# Altium PCB ePBR25_ACU_Controller_rev0.PcbDoc (part 2 of 2)
Units mil, origin at the board's own origin, x right, y up, seen from the top; angles counter-clockwise.
Board outline 3048 x 1903 mil, 2 copper layers (Top Layer, Bottom Layer); 150 components, 106 nets, 515 pads, 139 vias.
Unrouted connection lines stored in the file: 127.
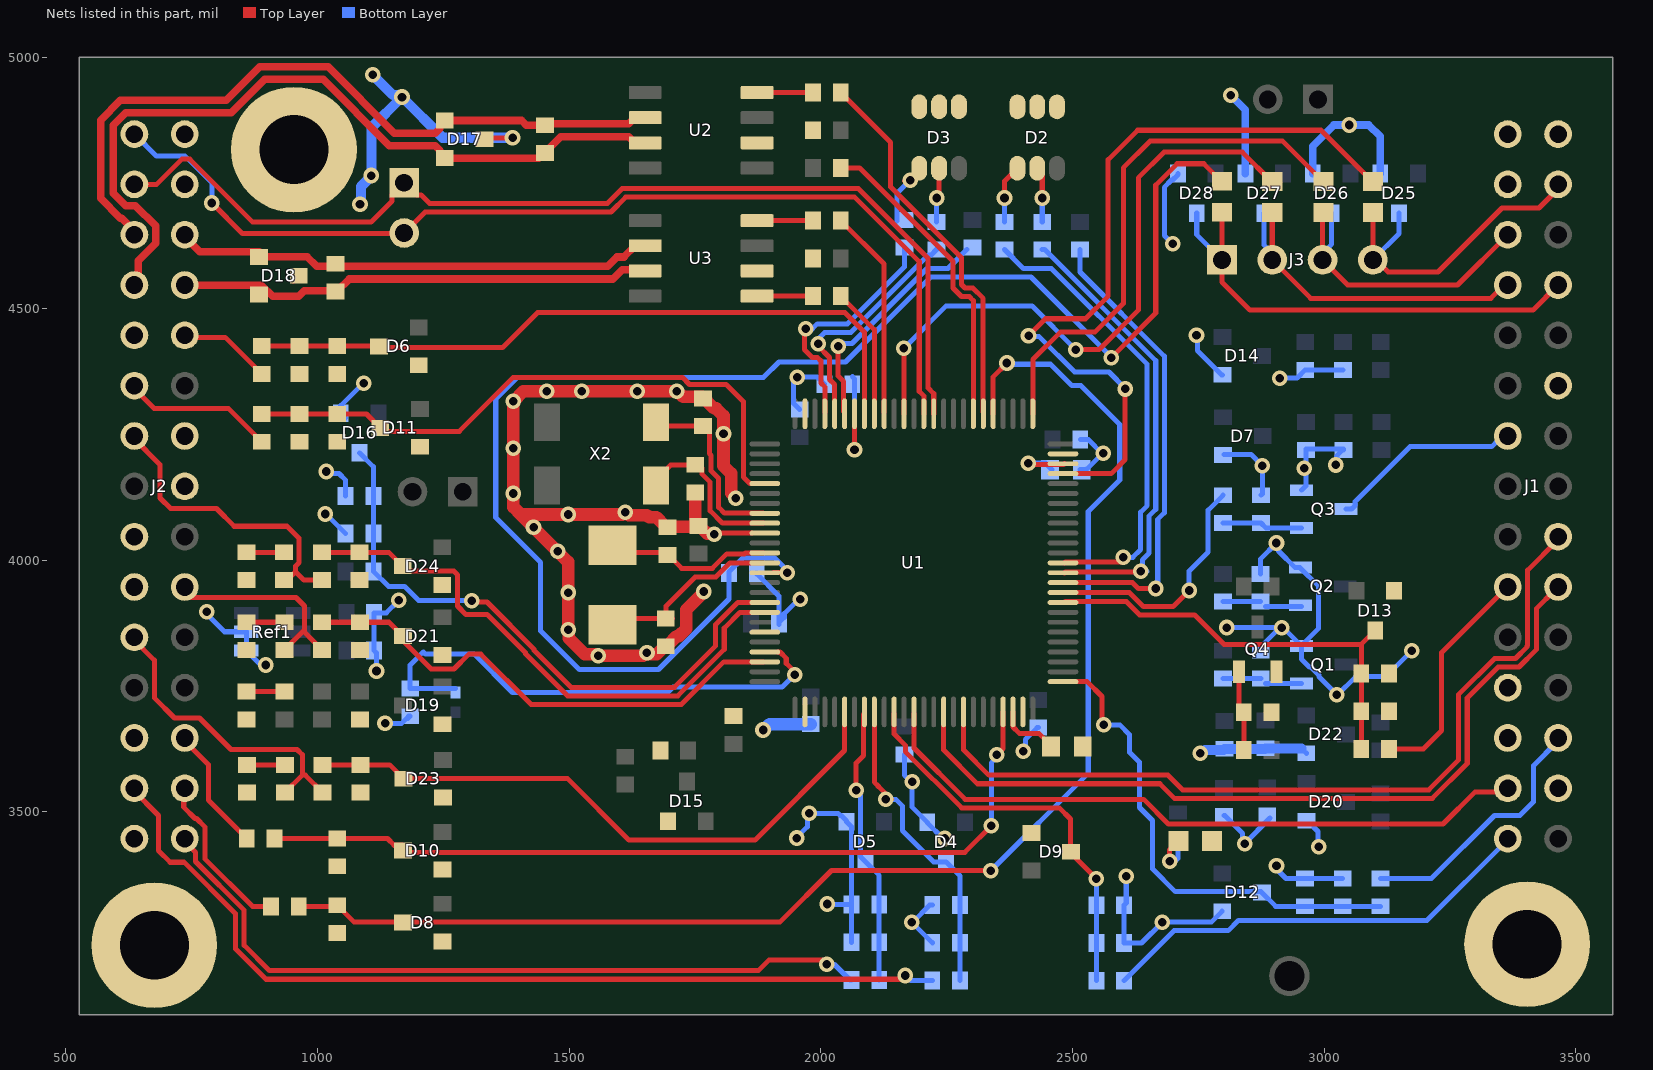
[diagram p2: the nets of this part, all layers, seen from the top]

## Via types
v1: diameter 31, hole 17, Top Layer to Bottom Layer, 139 vias

## Nets (pads, with @x,y where several pads share a name; then routed paths per layer and width w, separated by ;. In a path a pad name is that pad's centre, name@x,y a point inside that pad or via, vN(x,y) a via of type N, cw(c..) or ccw(c..) an arc to the next point about the centre after c; other vN are vias at no path point) (continued)
CAN_N: D17.1 J2.A13 R44.1 U2.6 | length 1459
  Top Layer w15: J2.A13@636,4647 636,4654.72 610.72,4680 608.25,4680 569,4719.25 569,4874.75 608.25,4914 818.36,4914 884.86,4980.5 1021.14,4980.5 1152.58,4849.06 1233.63,4849.06 1242.41,4857.85 1242.41,4865.71 D17.1@1250.66,4873.96 ; D17.1@1252.63,4873.96 1405.19,4873.96 1414.59,4864.56 R44.1@1452,4864.56 ; R44.1@1452,4867.06 1618.59,4867.06 1631.09,4879.56 U2.6@1650.78,4879.56
CAN_P: D17.2 J2.A12 R44.2 U2.7 | length 1569.2
  Top Layer w15: J2.A12@636,4547 643.65,4554.65 643.65,4595.26 678,4629.6 678,4664.4 637.4,4705 618.6,4705 594,4729.6 594,4864.4 618.6,4889 828.72,4889 895.22,4955.5 1010.78,4955.5 1142.22,4824.06 1233.63,4824.06 1242.41,4815.27 1242.41,4807.41 1250.66,4799.16 1439.75,4799.16 1450.03,4809.44 R44.2@1452,4809.44 ; R44.2@1450.41,4809 1483.47,4842.06 1618.59,4842.06 1631.09,4829.56 U2.7@1650.78,4829.56
CAN_R: R45.2 U2.4 | length 111.2
  Top Layer w10: U2.4@1873.78,4929.56 R45.2@1985,4929.56
CAN_Rx: R45.1 U1.81 | length 761.7
  Top Layer w10: R45.1@2039.56,4929.56 2138.87,4830.25 2138.87,4741.96 2279.63,4601.19 2279.63,4548.18 2286.66,4541.15 2302.01,4541.15 2322.5,4520.66 2322.5,4294.51 U1.81@2322.8,4294.21
CAN_SENS_D: R46.2 U3.1 | length 111.2
  Top Layer w10: U3.1@1872.78,4525 R46.2@1984,4525
CAN_SENS_N: D18.1 J2.B13 R47.1 U3.6 | length 951.8
  Top Layer w15: J2.B13@736.28,4643 766.28,4613 D18.1@883.63,4613 ; D18.1@883.63,4603 978.94,4603 997.96,4583.98 1576.21,4583.98 1594.98,4602.74 1608.84,4602.74 1631.09,4625 U3.6@1650.78,4625
CAN_SENS_P: D18.2 J2.B12 R47.2 U3.7 | length 950.8
  Top Layer w15: J2.B12@733.98,4543 737.98,4547 888.23,4547 910.57,4524.65 962.72,4524.65 973.42,4535.35 1039,4535.35 1062.62,4558.98 1586.57,4558.98 1605.33,4577.74 1648.04,4577.74 U3.7@1650.78,4575
CAN_SENS_R: R48.2 U3.4 | length 111.2
  Top Layer w10: U3.4@1872.78,4675 R48.2@1984,4675
CAN_SENS_Rx: R48.1 U1.91 | length 416.6
  Top Layer w10: R48.1@2039.56,4675 2125.94,4588.61 U1.91@2125.94,4294.21
CAN_SENS_Tx: R46.1 U1.92 | length 258.4
  Top Layer w10: R46.1@2039.56,4525 2106.26,4458.3 U1.92@2106.26,4294.21
CAN_Tx: R43.1 U1.82 | length 625.6
  Top Layer w10: R43.1@2039.56,4779.56 2077.23,4779.56 2262.63,4594.15 2262.63,4541.14 2279.62,4524.15 2294.97,4524.15 2303.11,4516.01 U1.82@2303.11,4294.21
EXTRA_INPUT1: J1.A1 R28.2 | length 875.9
  Bottom Layer w10: R28.2@2602.56,3164.63 2701.93,3264 2730.11,3264 2730.61,3264.5 2753.39,3264.5 2753.89,3264 2809.47,3264 2830.16,3284.69 3204.73,3284.69 3360.04,3440 J1.A1@3363.98,3440
EXTRA_INPUT1_µC: C22.2 D9.3 R28.1 R29.2 U1.36 | length 811.3
  Top Layer w10: U1.36@2145.63,3695.79 2145.63,3654.72 2168,3632.35 2168,3619.83 2279.83,3508 2474,3508 2496,3486 2496,3419 v1(2547.44,3367.56)
  Bottom Layer w10: R28.1@2547.44,3164.63 C22.2@2547.44,3239.63 R29.2@2547.44,3314.63 v1(2547.44,3367.56)
EXTRA_INPUT2: J2.A10 R31.2 | length 299.6
  Top Layer w10: J2.A10@633.98,4343 674.98,4302 822.44,4302 R31.2@889,4235.44
EXTRA_INPUT2_µC: C24.2 D11.3 R31.1 R32.2 U1.5 | length 1234.3
  Top Layer w10: R31.1@889,4290.56 C24.2@964,4290.56 R32.2@1039,4290.56 1097.07,4290.56 D11.3@1124.63,4263 1131.72,4255.91 1281.48,4255.91 1281.48,4256.37 1388.61,4363.5 1724.97,4363.5 1738.95,4349.52 1811.99,4349.52 1846.23,4315.28 1846.23,4165.16 1858.83,4152.56 1888.66,4152.56 U1.5@1888.74,4152.48
FANS_CTRL: J1.B7 U1.43 | length 1659.1
  Top Layer w10: U1.43@2283.43,3698.74 2283.43,3623.48 2333.9,3573 2689.74,3573 2718.74,3544 3208.04,3544 3267.5,3603.46 3267.5,3733.54 3338.97,3805.01 3367.95,3805.01 3380.35,3805.01 3403.48,3828.15 3403.48,3829.62 3404.5,3830.64 3404.5,3980.52 J1.B7@3463.98,4040
FANS_FB: J2.B6 R54.1 R56.2 | length 415.4
  Top Layer w10: J2.B6@726,3943 743,3926 957,3926 974,3909 974,3861.77 R56.2@934,3821.77 ; 974,3856.77 R54.1@1009,3821.77
FANS_FB_µC: C34.2 D21.3 R54.2 U1.23 | length 1009
  Top Layer w10: R54.2@1009,3876.88 C34.2@1084,3876.88 1142.07,3876.88 D21.3@1169.63,3849.33 1169.63,3840.23 1225.68,3784.18 1271.06,3784.18 1300.38,3813.5 1324.39,3813.5 1424.25,3713.64 1722.78,3713.64 1807.3,3798.15 U1.23@1885.79,3798.15
GL1: D2.5 R4.2 | length 110.6
  Top Layer w10: D2.5@2430,4778.98 2440,4768.98 v1(2440,4720)
  Bottom Layer w10: R4.2@2440,4672.56 v1(2440,4720)
GL2: D3.5 R7.2 | length 111.8
  Top Layer w10: v1@2235,4715.45 2234.02,4716.43 2234.02,4729.7 2235,4730.68 D3.5@2235,4779.02
  Bottom Layer w10: R7.2@2230,4672.56 v1(2230,4720)
GND: C1.1 C2.1 C3.1 C4.1 C5.1 C6.2 C7.1 C8.1 C9.1 C10.1 C11.1 C12.1 C13.1 C14.1 C15.1 C16.1 C17.1 C18.1 C19.1 C20.1 C21.1 C22.1 C23.1 C24.1 C25.1 C26.1 C27.1 C28.1 C29.1 C30.1 C31.1 C32.1 C33.1 C34.1 C35.1 C36.1 C37.1 D1.2 D2.1 D2.2 D2.3 D3.1 D3.2 D3.3 D4.1 D5.1 D6.1 D7.1 D8.1 D9.1 D10.1 D11.1 D12.1 D13.1 D14.1 D15.1 D16.1 D17.3 D18.3 D19.1 D20.1 D21.1 D22.1 D23.1 D24.1 D25.1 D26.1 D27.1 D28.1 J1.A3 J1.A4 J1.A14 J1.A15 J1.B2 J1.B10 J1.B15 J2.A1 J2.A3 J2.A6 J2.A7 J2.A11 J2.B8 J2.B9 J2.B14 J2.B15 pad.9@675.5,3235.08 pad.9@953,4816 pad.9@3403.48,3237 Q1.2 Q2.2 Q3.2 Q4.2 R2.2 R9.2 R11.1 R13.1 R16.1 R17.1 R19.1 R22.1 R24.1 R26.1 R29.1 R32.1 R35.1 R36.1 R38.1 R40.1 R42.1 R52.1 R53.2 R57.1 R58.2 R63.2 R64.2 Ref1.1 Ref1.2 U1.10 U1.20 U1.27 U1.49 U1.74 U1.99 U2.2 U3.2 | length 7675.5
  Top Layer w10: D18.3@951.62,4554.85 D18.3@962.37,4565.6 ; D17.3@1331.37,4836.56 1334.44,4839.63 v1(1387.36,4839.63) ; v1(1787.84,4051.59) 1790.22,4053.98 U1.10@1863.23,4053.98 ; v1@2805.71,3866.39 v1(2806.5,3866.39)
  Top Layer w25: v1(1558,3810.39) 1556.38,3810.39 1553.38,3813.39 1530.68,3813.39 1499.15,3844.92 1499.15,3860.62 v1(1498,3861.77) v1(1498,3935.94) 1498,3996.64 v1(1476.96,4017.69) v1(1429.09,4065.56) 1403.64,4091 ; v1@1558.84,3811.16 1559.61,3810.39 1646.85,3810.39 1652.85,3816.39 v1(1654.47,3816.39) ; v1@1655.62,3813.07 1673.65,3813.07 1686.54,3825.96 1688.5,3825.96 1695,3832.46 1696.97,3832.46 1713.59,3849.08 1717.55,3849.08 1732.6,3864.13 1732.6,3901.97 1767,3936.38 v1(1767,3938) ; C14.1@1750.37,4134.64 1750.37,4081.39 1751.78,4079.98 1751.78,4071.55 1755.03,4068.3 C12.1@1757,4068.3 ; v1(1787.84,4051.59) 1786.69,4052.74 1774.53,4052.74 1762.22,4065.05 1760.25,4065.05 C12.1@1757,4068.3 ; v1(1830.74,4123) 1830.74,4124.62 1821.58,4133.77 1821.58,4172.55 1806.57,4187.56 1806.57,4287.12 1791.79,4301.9 1787.84,4301.9 1764.72,4325.02 1726.18,4325.02 1715.2,4336 v1(1634.88,4336) v1(1524.85,4336) v1(1455.73,4336) 1409,4336 v1(1389,4316) v1(1389,4222.54) v1(1389,4132.8) 1389,4105.64 1403.64,4091 ; 1403.64,4091 v1(1498,4091) 1605.23,4091 1609.68,4095.44 1612.92,4095.44 1618.51,4089.85 1654.47,4089.85 1658.73,4085.6 1672.99,4085.6 1689.78,4068.81 1691.75,4068.81 C7.1@1695,4065.56 1696.37,4066.93 1755.63,4066.93 C12.1@1757,4068.3
  Bottom Layer w10: J2.B15@733.05,4854.61 J2.B15@734.12,4853.54 ; v1@777.28,3895.72 815,3858 Ref1.2@858.25,3858 Ref1.1@858.25,3820.6 886.85,3792 v1(897,3792) ; v1(1015,4092) 1011.14,4088.14 1011.14,4097.59 R42.1@1055.73,4053 ; v1(1017,4176.46) 1021.02,4172.44 1042.45,4172.44 1055.73,4159.16 C29.1@1055.73,4128 ; D16.1@1041,4282.53 1055.73,4282.53 D16.1@1045.89,4292.37 1045.89,4307.12 v1@1089.77,4351 ; v1(1084.25,4707.57) v1@1085.93,4709.25 ; v1@1106.75,4763.07 v1(1106.75,4764.57) ; v1(1117,3780) 1117,3815.89 C1.1@1112.39,3820.5 C2.1@1112.39,3895.5 1136.5,3895.5 v1@1160,3919 ; v1(1134,3676) 1167,3676 1181.13,3690.13 C16.1@1184,3690.13 C16.1@1179.28,3685.41 ; v1@1163.73,4924.59 v1(1167.75,4920.57) ; C5.1@1872.56,3975 1872.56,3973.03 1916.56,3929.03 C11.1@1916.56,3872 ; C11.1@1916.56,3875.97 1927.31,3886.72 1927.31,3893.86 1956.32,3922.86 v1(1958.75,3922.86) ; v1(1952.13,3448.11) 1952.13,3449.28 1973.12,3470.26 1973.12,3493.09 v1(1977.13,3497.11) 2034.3,3497.11 2038.32,3493.09 2040.29,3493.09 2051.04,3482.34 D5.1@2051.04,3480.37 2060.88,3470.53 2060.69,3470.53 2060.69,3316.19 R13.1@2060.88,3316 ; C13.1@1958,4299.56 1946,4311.56 1946,4364 1993.44,4364 R9.2@2007.44,4350 ; v1@2011.19,3316 R13.1@2060.88,3316 ; C18.1@2060.88,3241 R13.1@2060.88,3316 ; R2.2@2166,3614.44 2166,3573 v1@2179,3560 ; v1(2181.56,3560) 2181.56,3509.41 D4.1@2211.6,3479.37 2211.6,3478.28 2242.73,3447.15 v1(2246,3447.15) ; C17.1@2221.44,3240 2181.44,3280 2216.44,3315 R11.1@2221.44,3315 ; v1(2402.44,3620.5) 2406.46,3624.52 2406.46,3643.87 2430.03,3667.44 C9.1@2432,3667.44 ; C3.1@2514.56,4180 2528.37,4180 2528.37,4181 2559.37,4212 2531.37,4240 C8.1@2515.56,4240 ; v1(2606.92,3372) 2606.92,3318.99 R29.1@2602.56,3314.63 C22.1@2602.56,3239.63 2637.37,3239.63 v1(2678.74,3281) 2723.07,3281 2723.57,3281.5 2760.43,3281.5 2760.93,3281 2776.03,3281 D12.1@2797.63,3302.6 ; v1(2699,4629) 2682.5,4645.5 2682.5,4741.27 2696.88,4755.65 2698.85,4755.65 2709.6,4766.4 D28.1@2709.6,4768.37 ; v1(2746.48,4447) 2748.35,4445.14 2748.35,4416.5 2796.25,4368.6 D14.1@2798.22,4368.6 ; C33.1@2801.06,3492.44 2803.03,3492.44 2837.98,3457.49 2837.98,3441.02 v1(2842,3437) R52.1@2892.72,3487.72 ; D7.1@2801.06,4210.17 2855.09,4210.17 v1(2877.25,4188.01) 2877.25,4132.17 R19.1@2874.48,4129.4 ; v1(2806.5,3866.39) 2806.69,3866.2 2915.37,3866.2 v1(2915.56,3866) ; R17.1@2873.95,3973.03 2873.95,4002.92 v1(2905.4,4034.37) 2909.42,4030.35 2909.42,4018.56 2942.58,3985.4 2952.14,3985.4 2989.3,3948.24 2989.3,3865 Q1.2@2954.66,3830.36 ; R16.1@2874.29,3820.18 2874.29,3828.29 v1@2905,3859 ; R57.1@2882.84,3625.44 R57.1@2883.8,3626.39 ; v1(2905.49,3393) 2905.49,3386.51 2924.44,3367.56 C25.1@2962,3367.56 R35.1@3037,3367.56 ; v1(2912,4362) 2946.15,4362 C27.1@2962.59,4378.44 R38.1@3037.59,4378.44 ; v1@2926.02,3859 Q1.2@2954.66,3830.36 ; D22.1@2954.83,3626.39 D22.1@2964.63,3616.6 ; Q3.2@2955.19,4139.24 2964,4148.06 2964,4221.44 R26.1@3039,4221.44 ; D20.1@2980,3469 2987.86,3461.14 2987.86,3432.41 v1(2989.64,3430.64) ; v1(3023,4189.44) 3026.08,4192.52 3026.08,4208.69 3036.83,4219.44 R26.1@3038.8,4219.44 ; v1(3174.05,3820.18) 3122.68,3768.81 3062.69,3768.81 3026.88,3733 v1(3025.56,3733) 2989.64,3768.92 2989.64,3772 2973.86,3787.78 2970.78,3787.78 2955,3803.56 Q1.2@2955,3830.02 Q1.2@2954.66,3830.36
  Bottom Layer w15: v1(2814.73,4924.33) 2843.6,4895.46 D27.1@2843.6,4768.37 ; D26.1@2977.6,4768.37 2977.6,4823 3019.6,4865 3089,4865 3111.6,4842.4 D25.1@3111.6,4768.37
  Bottom Layer w20: v1@1085.93,4709.25 1085.93,4742.25 v1@1106.75,4763.07 ; v1(1106.75,4764.57) 1106.75,4859.57 v1(1167.75,4920.57) 1248.69,4839.63 v1(1387.36,4839.63) ; v1(1109.6,4964.57) 1149.58,4924.59 v1@1163.73,4924.59 ; v1(2753.89,3616.6) 2756.87,3616.6 2763.51,3623.24 2799.8,3623.24 C35.1@2802,3625.44 R57.1@2882.84,3625.44 ; R57.1@2883.8,3626.39 D22.1@2954.83,3626.39
  Bottom Layer w25: v1(1885.12,3662.78) 1886.75,3662.78 1898.41,3674.44 C10.1@1980,3674.44
  other v1: 2180.56,3281 2012.75,3317 779.66,3898.09 1161.56,3920.26 1611.3,4095.44 2960.56,4183 2560.93,4213 1806.57,4251.24 1713.57,4336 1091.33,4352 1953,4364 3050,4865
HCP_H_CURR_SENS: J2.B1 R12.2 | length 1510.9
  Top Layer w10: J2.B1@733.98,3443 757.34,3419.65 757.34,3401.49 854,3304.83 854,3235.08 904.58,3184.5 1875.78,3184.5 1897.28,3206 2003,3206 v1(2012,3197)
  Bottom Layer w10: v1(2012,3197) 2027,3197 2058,3166 R12.2@2060.88,3166
HCP_H_CURR_SENS_µC: C18.2 D5.3 R12.1 R13.2 U1.33 | length 555.7
  Top Layer w10: v1(2070,3543) 2070,3596.92 2084.8,3611.71 2084.8,3694.01 U1.33@2086.57,3695.79
  Bottom Layer w10: v1(2070,3543) 2070,3541.43 2079,3532.43 2079,3411.07 D5.3@2088.44,3401.63 2116,3374.07 R12.1@2116,3166
HCP_L_CURR_SENS: J2.A2 R10.2 | length 1832.1
  Top Layer w10: J2.A2@633.98,3543 684,3492.98 684,3423 707,3400 734.79,3400 837,3297.79 837,3228.04 897.54,3167.5 2160.5,3167.5 v1(2168,3175)
  Bottom Layer w10: v1(2168,3175) 2169,3175 2179,3165 R10.2@2221.44,3165
HCP_L_CURR_SENS_µC: C17.2 D4.3 R10.1 R11.2 U1.34 | length 643
  Top Layer w10: U1.34@2106.26,3695.79 2106.26,3559.21 2114.07,3551.39 2114.07,3550.93 2140,3525 v1(2129,3525)
  Bottom Layer w10: v1(2129,3525) 2149,3525 2162,3512 2162,3463 2224.37,3400.63 D4.3@2249,3400.63 2276.56,3373.07 R11.2@2276.56,3315 C17.2@2276.56,3240 R10.1@2276.56,3165
IMD__OK: J1.B3 R33.1 | length 507
  Bottom Layer w10: R33.1@3112,3367.56 3213.26,3367.56 3338.7,3493 3389,3493 3416,3520 3416,3592.02 J1.B3@3463.98,3640
IMD__OK_µC: C25.2 D12.3 R33.2 R35.2 U1.51 | length 973.1
  Top Layer w10: U1.51@2484.21,3758.78 2529.22,3758.78 2558.74,3729.26 2558.74,3676.26 v1(2562,3673)
  Bottom Layer w10: v1(2562,3673) 2593.96,3673 2613.5,3653.46 2613.5,3618.61 2633.12,3598.99 2633.12,3508.72 2659,3482.84 2659,3387 2704.5,3341.5 2874.87,3341.5 D12.3@2876.37,3340 2903.93,3312.44 C25.2@2962,3312.44 R35.2@3037,3312.44 R33.2@3112,3312.44
IMD_RESIST: J2.B11 R23.1 | length 185.1
  Top Layer w10: J2.B11@733.98,4443 816.44,4443 R23.1@889,4370.44
IMD_RESIST_µC: C19.2 D6.3 R23.2 R24.2 U1.93 | length 1402.7
  Top Layer w10: R23.2@889,4425.56 C19.2@964,4425.56 R24.2@1039,4425.56 1121.63,4425.56 D6.3@1122.19,4425 1124.47,4422.72 1367.72,4422.72 1437.02,4492.02 2047.98,4492.02 2086.57,4453.43 U1.93@2086.57,4294.21
LED_B1: R5.1 U1.61 | length 936
  Top Layer w10: U1.61@2484.21,3955.63 2619.37,3955.63 2631,3944 v1(2665.5,3944)
  Bottom Layer w10: R5.1@2515,4617.44 2515,4573 2682.5,4405.5 2682.5,4094.39 2669.5,4081.39 2669.5,3948 v1(2665.5,3944)
LED_B2: R8.1 U1.95 | length 472.1
  Top Layer w10: v1(2034.23,4425) 2034.23,4366.48 2045.43,4355.29 2045.43,4295.99 U1.95@2047.2,4294.21
  Bottom Layer w10: v1(2034.23,4425) 2038.45,4425 2045,4431.55 2045.55,4430.99 2062.08,4430.99 2211.08,4580 2252.56,4580 R8.1@2290,4617.44
LED_G1: R4.1 U1.62 | length 915.5
  Top Layer w10: U1.62@2484.21,3975.32 2484.53,3975 2486.62,3977.09 2635.09,3977.09 v1(2636,3978)
  Bottom Layer w10: R4.1@2440,4617.44 2444.7,4617.44 2665.5,4396.64 2665.5,4101.43 2652.5,4088.43 2652.5,4014.46 2639,4000.96 2639,3987 2648,3978 v1(2636,3978)
LED_G2: R7.1 U1.96 | length 471.8
  Top Layer w10: v1(1995,4430.08) 1995,4425.34 2017.23,4403.11 2017.23,4359.44 2027.52,4349.15 U1.96@2027.52,4294.21
  Bottom Layer w10: v1(1995,4430.08) 1990.08,4435 2007.58,4452.5 2059.54,4452.5 2213.73,4606.69 2219.25,4606.69 R7.1@2230,4617.44
LED_R1: R3.1 U1.63 | length 919
  Top Layer w10: U1.63@2484.21,3995 2485.99,3996.78 2601,3996.78 v1(2601,4006)
  Bottom Layer w10: R3.1@2365,4617.44 2402.44,4580 2458.1,4580 2648.5,4389.6 2648.5,4108.47 2635.5,4095.47 2635.5,4021.5 2620,4006 v1(2601,4006)
LED_R2: R6.1 U1.97 | length 471.6
  Top Layer w10: v1@1967.5,4460 1967.5,4418.69 1983.61,4402.58 1993.72,4402.58 2000.23,4396.07 2000.23,4352.4 2007.83,4344.79 U1.97@2007.83,4294.21
  Bottom Layer w10: v1@1973.79,4462.5 1976.29,4460 1983,4460 1993,4470 2053,4470 2166,4583 R6.1@2166,4621.97
  other v1: 1970,4460
MC_PWR_CTRL: J1.A2 U1.38 | length 1336.9
  Top Layer w10: U1.38@2185,3695.79 2185,3626.88 2286.88,3525 2641.57,3525 2690.57,3476 3236.21,3476 3300.21,3540 J1.A2@3363.98,3540
MC_PWR_FB: J2.A5 R59.1 R60.2 | length 618.7
  Top Layer w10: J2.A5@633.98,3843 675.5,3801.48 675.5,3726.61 715.61,3686.5 765.5,3686.5 828,3624 959.15,3624 969.56,3613.59 969.56,3573 ; R60.2@935,3538.44 969.56,3573 ; R59.1@1010,3538.44 975.44,3573 969.56,3573
MC_PWR_FB_µC: C36.2 D23.3 R59.2 U1.31 | length 1246.6
  Top Layer w10: R59.2@1010,3593.56 C36.2@1085,3593.56 1143.07,3593.56 D23.3@1170.63,3566 1496.88,3566 1618.88,3444 1869,3444 2047.2,3622.2 U1.31@2047.2,3695.79
NetC16_2: C16.2 L1.1 U1.22 | length 1020.7
  Top Layer w10: U1.22@1914.25,3817.76 1918.65,3817.76 1931.25,3805.16 1931.25,3795.28 1947.92,3778.61 v1(1947.92,3772.93)
  Bottom Layer w10: L1.1@1273.74,3745.24 C16.2@1184,3745.24 1184,3792 1210,3818 1214.5,3813.5 1311.07,3813.5 1387.2,3737.37 1695.44,3737.37 1706.07,3748 1923,3748 v1(1947.92,3772.93)
NetD1_1: D1.1 R1.2 | length 102.1
  Top Layer w10: v1(2693,3402) 2693,3424.46 D1.1@2710.54,3442
  Bottom Layer w10: v1(2693,3402) 2703.93,3402 2709.82,3407.89 R1.2@2709.82,3443.44
NetQ1_1: Q1.1 R14.2 R16.2 | length 145.9
  Bottom Layer w10: R14.2@2799.29,3765.06 R16.2@2874.29,3765.06 ; R16.2@2884.13,3755.22 Q1.1@2955,3755.22
NetQ2_1: Q2.1 R15.2 R17.2 | length 145.9
  Bottom Layer w10: R15.2@2798.95,3917.92 R17.2@2873.95,3917.92 ; R17.2@2883.8,3908.07 Q2.1@2954.66,3908.07
NetQ4_1: Q4.1 R21.2 R22.2 | length 145.9
  Top Layer w10: R22.2@2830.6,3707.84 Q4.1@2830.6,3778.71 ; R21.2@2840.44,3623 R22.2@2840.44,3698
NetR9_1: R9.1 U1.94 | length 213.4
  Top Layer w10: v1@2066.89,4227.56 U1.94@2066.89,4294.21
  Bottom Layer w10: R9.1@2062.56,4365 2066.89,4360.67 v1(2066.89,4220)
NetR51_1: R51.1 R53.1 | length 75
  Top Layer w10: R53.1@859,3739.12 R51.1@934,3739.12
NetR56_1: R56.1 R58.1 | length 75
  Top Layer w10: R58.1@859,3876.88 R56.1@934,3876.88
NetR60_1: R60.1 R63.1 | length 75
  Top Layer w10: R63.1@860,3593.56 R60.1@935,3593.56
NetR62_1: R62.1 R64.1 | length 75
  Top Layer w10: R64.1@858.48,4015.96 R62.1@933.48,4015.96
NRST: D28.3 F1.2 J1.B12 J3.1 | length 964
  Top Layer w10: F1.2@2797,4691.61 J3.1@2797,4597 2797,4552.81 2852.81,4497 3415,4497 J1.B12@3465,4547
  Bottom Layer w10: D28.3@2747,4689.63 2747,4647 J3.1@2797,4597
OSC1_IN: C6.1 U1.8 X2.1 | length 365.9
  Top Layer w10: X2.1@1672.27,4274.53 1680.14,4266.65 1767.83,4266.65 1778.57,4255.91 1778.57,4211.99 1782.07,4208.49 1782.07,4177.41 1797.08,4162.4 1797.08,4105.28 1808.59,4093.77 1885.44,4093.77 U1.8@1885.79,4093.43
OSC1_OUT: C14.2 U1.9 X2.4 | length 314.1
  Top Layer w10: X2.4@1672.27,4148.54 1672.27,4160.35 1701.47,4189.56 C14.2@1755,4189.56 ; C14.2@1763.53,4183 1763.53,4171.92 1780.08,4155.36 1780.08,4098.24 1804.23,4074.09 1885.44,4074.09 U1.9@1885.79,4073.74
OSC2_IN: C7.2 U1.12 X1.2 | length 325.9
  Top Layer w10: X1.2@1586,4052.8 X1.2@1611.3,4027.5 ; X1.2@1619.3,4015.44 C7.2@1695,4015.44 ; C7.2@1695,4010.44 1696.97,4010.44 1723.41,3984 1784.34,3984 1813.25,4012.91 1848.08,4012.91 1849.86,4014.68 U1.12@1885.79,4014.68
OSC2_OUT: C15.2 U1.13 X1.1 | length 365.4
  Top Layer w10: X1.1@1594,3883.26 1595.07,3884.33 C15.2@1691.75,3884.33 ; C15.2@1705,3884.33 C15.2@1691.75,3884.33 ; U1.13@1885.79,3995 1885.44,3994.65 1819.04,3994.65 1791.39,3967 1750.37,3967 1692.58,3909.22 1692.58,3885.16 C15.2@1691.75,3884.33
PRECHRG_CTRL: J1.A9 Q3.3 | length 382
  Bottom Layer w10: Q3.3@3043.77,4101.84 3054.6,4101.84 3061.41,4108.65 3061.41,4116.41 3170.85,4225.85 3333.15,4225.85 3347.3,4240 J1.A9@3363.98,4240
PRECHRG_CTRL_µC: R18.1 U1.60 | length 489.7
  Top Layer w10: U1.60@2484.21,3935.94 2613.06,3935.94 2640.8,3908.2 2700.02,3908.2 v1(2731.82,3940)
  Bottom Layer w10: v1(2731.82,3940) 2731.82,3978.6 2769.76,4016.54 2769.76,4099.68 R18.1@2799.48,4129.4
PUMP_CTRL: J1.B6 U1.41 | length 1627.5
  Top Layer w10: U1.41@2244.06,3695.79 2244.06,3622.95 2311,3556 2673.51,3556 2702.51,3527 3215.08,3527 3284.5,3596.42 3284.5,3726.5 3346.01,3788.01 3387.39,3788.01 3421.89,3822.51 3421.89,3903.89 3458,3940 J1.B6@3463.98,3940
PUMP_FB: J2.A9 R61.1 R62.2 | length 608.4
  Top Layer w10: J2.A9@633.98,4243 687,4189.98 687,4124 708,4103 799.04,4103 834.35,4067.69 939.31,4067.69 963.19,4043.81 963.19,3995.24 956.23,3988.28 956.23,3977.23 ; R62.2@933.48,3960.84 939.84,3960.84 956.23,3977.23 ; R61.1@1008.48,3960.84 972.62,3960.84 956.23,3977.23
PUMP_FB_µC: C37.2 D24.3 R61.2 U1.18 | length 1126.8
  Top Layer w10: R61.2@1008.48,4015.96 C37.2@1083.48,4015.96 1141.55,4015.96 D24.3@1169.11,3988.4 1178.76,3978.75 1270.53,3978.75 1277.19,3972.09 1278.09,3971.19 1278.09,3909.02 1294.61,3892.5 1337.05,3892.5 1413.19,3816.36 1413.19,3814.03 1496.57,3730.64 1715.74,3730.64 1808.1,3822.99 1808.1,3865.22 1839.45,3896.57 U1.18@1885.79,3896.57
PWR_MON_SCL: J2.B3 R30.1 | length 247.9
  Top Layer w10: J2.B3@733.98,3643 783,3593.98 783,3523.29 R30.1@859.29,3447
PWR_MON_SDA: J2.B2 R27.1 | length 326
  Top Layer w10: J2.B2@733.98,3543 733.98,3509.57 756.56,3487 759.4,3487 776,3470.4 776,3406.87 871,3311.87 R27.1@907.44,3311.87
Q3g: Q3.1 R18.2 R19.2 | length 159.8
  Bottom Layer w10: R18.2@2799.48,4074.28 R19.2@2874.48,4074.28 2884.32,4064.44 Q3.1@2955.19,4064.44
RL1: D2.4 R3.2 | length 117
  Top Layer w10: v1(2365,4720) 2365,4753.35 D2.4@2390.63,4778.98
  Bottom Layer w10: R3.2@2365,4672.56 v1(2365,4720)
RL2: D3.4 R6.2 | length 133.4
  Top Layer w10: v1@2166.37,4753.35 2170.39,4757.36 2177.01,4757.36 2195.63,4775.98 D3.4@2195.63,4779.02
  Bottom Layer w10: R6.2@2151,4674.43 2151,4728.85 v1(2177.37,4755.22)
SCHT_TAP: J1.A6 R34.1 | length 454.1
  Top Layer w10: R34.1@3129.12,3625 3197.06,3625 3233.5,3661.44 3233.5,3816.5 J1.A6@3360.49,3943.49
SERIAL_Rx: J2.A15 J4.2 U1.87 | length 2053.5
  Top Layer w10: v1(790,4710) 850.5,4649.5 J4.2@1172,4649.5 ; J4.2@1172,4650.41 1213.81,4692.21 1582.83,4692.21 1612.33,4721.72 2067.32,4721.72 2195.57,4593.47 2195.57,4335.89 2204.69,4326.77 U1.87@2204.69,4291.26
  Bottom Layer w10: J2.A15@636,4847 679.8,4803.2 736.8,4803.2 790,4750 v1(790,4710)
SERIAL_Tx: J2.A14 J4.1 U1.86 | length 2089.5
  Top Layer w10: J2.A14@636,4747 680.14,4747 730.14,4797 746,4797 871.02,4671.98 1105.98,4671.98 1148.07,4714.07 1148.07,4726.47 J4.1@1172,4750.41 1196.53,4725.88 1205.9,4725.88 1222.57,4709.21 1575.79,4709.21 1605.29,4738.72 2074.36,4738.72 2212.81,4600.26 2212.81,4342.68 2224.37,4331.13 U1.86@2224.37,4291.26
SHCT_TAP_µC: C26.2 D13.3 R34.2 R36.2 U1.59 | length 873.1
  Top Layer w10: U1.59@2484.21,3916.26 2485.99,3918.04 2606.92,3918.04 2633.75,3891.2 2742.8,3891.2 2801.35,3832.65 2884.78,3832.65 2885.2,3833.07 3074,3833.07 ; R34.2@3074,3625 R36.2@3074,3700 C26.2@3074,3775 3074,3833.07 ; D13.3@3101.56,3860.63 3074,3833.07
SWCLK: D26.3 F3.2 J1.A13 J3.3 | length 625.3
  Top Layer w10: F3.2@2999,4691.27 2997,4689.27 J3.3@2997,4597 3047,4547 3265,4547 J1.A13@3365,4647
  Bottom Layer w10: J3.3@2997,4597 2997,4610.27 3015,4628.27 D26.3@3015,4689.63
SWDIO: D25.3 F4.2 J1.B14 J3.4 | length 663.5
  Top Layer w10: F4.2@3097,4691 J3.4@3097,4597 3103.39,4597 3127.39,4573 3226.5,4573 3353.5,4700 3427,4700 3465,4738 J1.B14@3465,4747
  Bottom Layer w10: J3.4@3097,4597 3149,4649 D25.3@3149,4689.63
SWO: D27.3 F2.2 J1.A12 J3.2 | length 703.9
  Top Layer w10: F2.2@2897,4691.13 J3.2@2897,4597 2973.34,4520.66 3331.24,4520.66 3357.58,4547 J1.A12@3365,4547
  Bottom Layer w10: D27.3@2881,4689.63 2881,4626.27 2897,4610.27 J3.2@2897,4597
UC_NRST: C5.2 F1.1 U1.14 | length 3114.1
  Top Layer w10: U1.14@1906.19,3975.32 v1(1933.42,3975.32) ; v1(2576.84,4402.58) 2665.5,4491.24 2665.5,4745.48 2708.02,4788 2760.97,4788 2795.62,4753.35 F1.1@2797,4753.35
  Bottom Layer w10: v1@1933.42,3979.58 1908.28,4004.72 1845.19,4004.72 1817.44,3976.97 C5.2@1817.44,3975 1817.44,3923 1677.33,3782.89 1520.11,3782.89 1443,3860 1443,3996 1354,4085 1354,4319.89 1397.61,4363.5 1886.19,4363.5 1916.69,4394 2049.12,4394 2218.12,4563 2417.69,4563 2576.84,4403.85 v1(2576.84,4402.58)
uC_PWR_MON_SCL: C23.2 D10.3 R30.2 U1.47 | length 1688
  Top Layer w10: R30.2@914.41,3447 1139.07,3447 1152.32,3433.75 1168.24,3433.75 1182.35,3419.65 2286.13,3419.65 v1@2342.48,3476 ; v1@2353,3617 2362.17,3626.17 U1.47@2362.17,3698.74
  Bottom Layer w10: v1(2338.82,3472.64) 2338.82,3597.44 v1@2349.34,3607.96
  other v1: 2349.34,3613.64
uC_PWR_MON_SDA: C21.2 D8.3 R27.2 U1.80 | length 2810.3
  Top Layer w10: R27.2@963.19,3311.87 C21.2@1039,3311.87 ; C21.2@1039,3314.56 1072.56,3281 1918.54,3281 2021.14,3383.6 v1@2333.9,3383.6 ; U1.80@2342.48,4291.26 2342.48,4364.66 v1(2369.85,4392.03)
  Bottom Layer w10: v1(2337.97,3383.43) 2531.37,3576.83 2531.37,4096.97 2593.96,4159.56 2593.96,4269.92 2516.88,4347 2499.02,4347 2456.41,4389.6 v1@2365,4389.6
UC_SWCLK: F3.1 U1.76 | length 1056.4
  Top Layer w10: U1.76@2421.22,4291.26 2421.22,4398.85 2475.8,4453.43 2544.3,4453.43 2601,4510.13 2601,4780 2654,4833 2917.62,4833 2997.62,4753 F3.1@2999,4753
UC_SWDIO: F4.1 U1.72 | length 1540.7
  Top Layer w10: v1(2412.73,4446.33) 2446.4,4480 2526,4480 2571,4525 2571,4796 2629.56,4854.56 2993.8,4854.56 3095.62,4752.73 F4.1@3097,4752.73 ; U1.72@2506.77,4172.17 2576.84,4172.17 2604.61,4199.94 v1(2604.61,4340.5)
  Bottom Layer w10: v1(2412.73,4446.33) 2414.64,4444.42 2433.95,4444.42 2504.37,4374 2572.48,4374 2604.61,4341.88 v1(2604.61,4340.5)
UC_SWO: F2.1 U1.89 | length 1273.8
  Top Layer w10: v1(2165.08,4421.57) 2165.08,4364.4 2165.32,4364.16 U1.89@2165.32,4291.26 ; v1(2506.77,4418.69) 2552.69,4418.69 2631,4497 2631,4760 2682,4811 2837.49,4811 2895.62,4752.87 F2.1@2897,4752.87
  Bottom Layer w10: v1(2165.08,4421.57) 2249.16,4505.65 2419.81,4505.65 v1(2506.77,4418.69)
V_CAP_1: C4.2 U1.48 | length 122.8
  Top Layer w10: U1.48@2381.85,3698.74 U1.48@2381.85,3698.74 2381.93,3668.83 2394.53,3656.23 2433.24,3656.23 2457.5,3631.97 C4.2@2457.5,3630
V_CAP_2: C3.2 U1.73 | length 133.9
  Top Layer w10: v1@2412,4184.85 v1@2412,4190.07 ; v1(2412,4193) v1@2412,4190.07 ; U1.73@2484.21,4191.85 2482.43,4190.07 v1@2412,4190.07
  Bottom Layer w10: v1(2412,4193) 2414.74,4193 2446.44,4193 2447.59,4191.85 C3.2@2459.44,4180
vBATT_uC: C29.2 D16.3 R41.2 R42.2 U1.17 | length 1213.4
  Top Layer w10: v1(1306,3920) 1308.91,3917.09 1336.5,3917.09 1430.19,3823.4 1430.19,3821.07 1503.62,3747.64 1708.7,3747.64 1791.1,3830.03 1791.1,3872.26 1835.09,3916.26 U1.17@1885.79,3916.26
  Bottom Layer w10: D16.3@1083.29,4213.63 1110.85,4186.07 C29.2@1110.85,4128 R42.2@1110.85,4053 R41.2@1110.85,3978 1141.09,3947.76 1172.95,3947.76 1200.71,3920 v1(1306,3920)
pads on no net: Ref1.3 Ref1.5 U1.1 U1.2 U1.3 U1.4 U1.6 U1.7 U1.15 U1.16 U1.25 U1.26 U1.30 U1.32 U1.35 U1.39 U1.40 U1.42 U1.44 U1.45 U1.46 U1.58 U1.64 U1.65 U1.66 U1.67 U1.68 U1.69 U1.71 U1.77 U1.78 U1.79 U1.83 U1.85 U1.88 U1.90 U1.98 U2.5 U2.8 U3.5 U3.8 X2.2 X2.3

## Polygon pours and split planes (outlines as drawn)
3V3 on Bottom Layer "Bottom Layer-3V3" (solid, remove dead copper, pour order 16): 544,3112 3556,3112 3556,4984 544,4984
GND on Bottom Layer "Partial Bottom Layer-GND" (solid, pour order 15): 1397.61,4351 1367,4320.39 1367,4101.05 1476.96,3991.09 1476.96,3843.27 1530.04,3790.19 1680.8,3790.19 1682.72,3788.28 1747.39,3852.94 1747.39,3887.61 1792,3932.22 1792,3974 1807.36,3989.36 1923.64,3989.36 1923.64,4099.48 1919.8,4103.33 1858.27,4103.33 1858.27,4103.41 1850.14,4111.54 1850.14,4146.18 1837.16,4159.16 1837.56,4159.56 1837.56,4193.36 1828.61,4193.36 1824.18,4197.79 1826.25,4199.86 1826.25,4292.37 1778.12,4340.5 1733.76,4340.5 1723.26,4351
GND on Top Layer "Top Layer-GND" (solid, pour order 6): 547,3116 3556,3116 3556,4975 547,4975

## Other copper
Top Layer:
  pour cut-out: 1721.25,4351.26 1736.26,4339.73 1740.24,4339.73 1810.49,4339.73 1837.56,4312.66 1837.56,4159.57 1854.88,4113.11 1763.53,4082.35 1776.1,4048 1787.84,3940 1758.09,3871.06 1740.24,3843.68 1723,3821.07 1684.82,3782.89 1516.45,3782.89 1516.45,3785.97 1476.96,3825.46 1476.96,3989.97 1361.8,4105.14 1361.8,4319.38 1393.68,4351.26

## Silkscreen, mask and mechanical layers (free items; w line width, h text height)
Top Overlay:
  drawing of 7 lines, arcs and shapes, not listed
  text "SWO" at 2912,4447 h30 r90
  text "CLK" at 3012,4447 h30 r90
  text "NRST" at 2806.4,4421.57 h30 r90
  text "3V3" at 3319.48,4405.15 h30 r90
  text "SWDIO" at 3114,4393 h30 r90
  text "3V3" at 811,4301 h30 r90
  text "VS" at 586,4117 h30 r90
  text "LOCK_IN" at 2784.5,4074.28 h60
  text "VS" at 3319.48,4014.58 h30 r90
  text "5V" at 808,3714 h30 r90
  text "3V3" at 594,3703 h30 r90
  text "3V3" at 3545,3395.18 h30 r90
  text "UMSAE" at 1476.96,3268.92 h100
  text "3V3" at 2988,3155 h30
  text "ePBR25_ACU_Controller_rev0" at 1319,3138 h30
Bottom Overlay:
  drawing of 18 lines, arcs and shapes, not listed
Board Outline:
  lines w10: 526,3097 526,5004.05 3574,5004.05 3574,3097 526,3097

## Text inside footprints (layer, text, board x,y; h text height)
J1: Mechanical 1 "B1" at 3465,3392 h31.25 r270; Mechanical 1 "A1" at 3365,3392 h31.25 r270; Top Overlay "B1" at 3465,3392 h31.25 r270; Top Overlay "A1" at 3365,3392 h31.25 r270; Bottom Overlay "B1" at 3465,3392 h31.25 r270; Bottom Overlay "A1" at 3365,3392 h31.25 r270
J2: Mechanical 1 "A1" at 636,3392 h31.25 r270; Mechanical 1 "B1" at 736,3392 h31.25 r270; Top Overlay "A1" at 636,3392 h31.25 r270; Top Overlay "B1" at 736,3392 h31.25 r270; Bottom Overlay "A1" at 636,3392 h31.25 r270; Bottom Overlay "B1" at 736,3392 h31.25 r270